# Altium PCB PowerFull.PcbDoc
Units mil, origin at the board's own origin, x right, y up, seen from the top; angles counter-clockwise.
Board outline 8110.03 x 4010.03 mil, 2 copper layers (Top Layer, Bottom Layer); 49 components, 34 nets, 159 pads, 0 vias.
Unrouted connection lines stored in the file: 111.
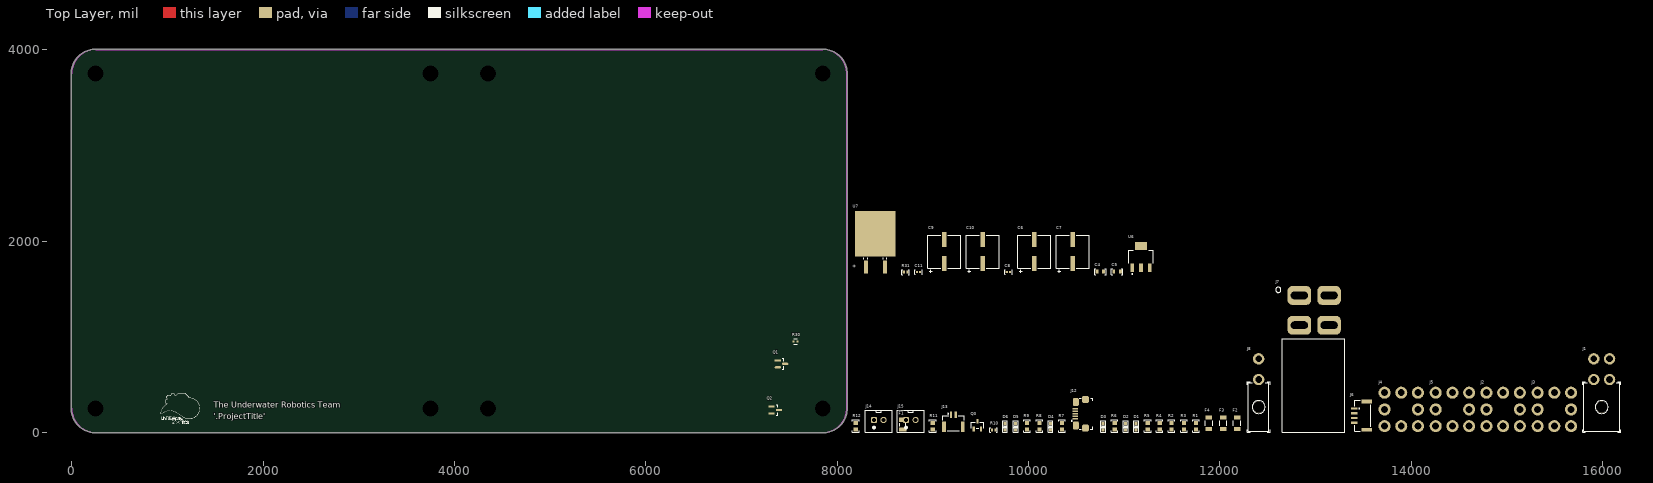
[diagram p0: Top Layer view]
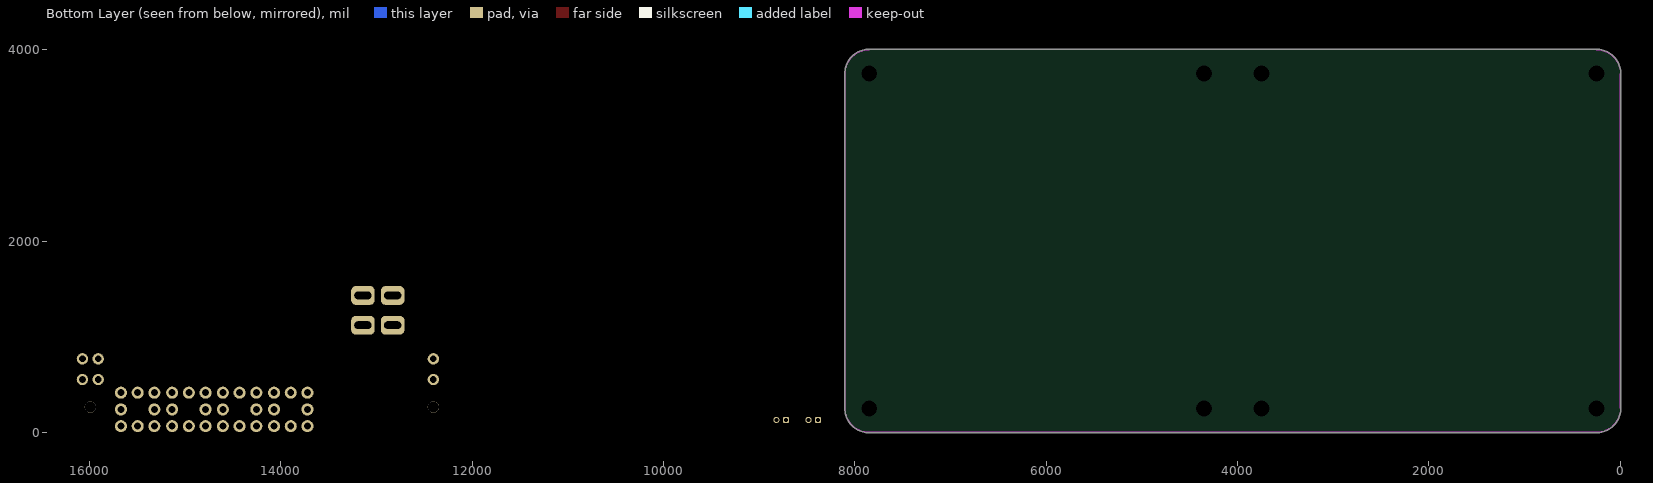
[diagram p1: Bottom Layer view, seen from below]

## Layer stack, top to bottom
Top Solder: solder mask 0.4, Solder Resist, Dk 3.5
Top Layer: signal copper 1.4
Dielectric 1: dielectric 12.6, FR-4, Dk 4.8
Bottom Layer: signal copper 1.4
Bottom Solder: solder mask 0.4, Solder Resist, Dk 3.5

## Board outline
250,-5.01 cw(c250,250) -5.01,250 -5.01,3750 cw(c250,3750) 250,4005.01 7850,4005.01 cw(c7850,3750) 8105.02,3750 8105.02,250 cw(c7850,250) 7850,-5.01

## Design rules (kind name [scope] priority, off if disabled: settings)
Clearance [All] p1: gap=10 ignorepadtopadclearanceinfootprint=FALSE except(0: Arc-Hole Track-Hole SMDPad-Hole THPad-Hole Via-Hole Fill-Hole Poly-Hole Region-Hole Text-Hole)
PolygonConnect [All] p1: connectstyle=Relief reliefconductorwidth=10 reliefentries=4 polygonreliefangle="90 Angle" airgapwidth=10
RoutingVias [All] p1: holewidth=28 width=50 viastyle="Through Hole" minholewidth=28 minwidth=50 maxholewidth=28 maxwidth=50
SolderMaskExpansion [All] p1: expansion=4 istentingtop=FALSE
SupplyNets "Schematic Supply Nets_6" [InNet('3V3')] p1: voltage=0.000
SupplyNets "Schematic Supply Nets_5" [InNet('MOTOR_PWR')] p2: voltage=0.000
SupplyNets "Schematic Supply Nets_4" [InNet('GND')] p3: voltage=0.000
SupplyNets "Schematic Supply Nets_3" [InNet('V+')] p4: voltage=0.000
SupplyNets "Schematic Supply Nets_2" [InNet('12V')] p5: voltage=0.000
SupplyNets "Schematic Supply Nets_1" [InNet('5V')] p6: voltage=0.000
SupplyNets "Schematic Supply Nets" [InNet('Vreg')] p7: voltage=0.000
Width [All] p1: maxlimit=10 minlimit=10 preferedwidth=10
30 further rules are at their usual default settings.

## Classes and differential pairs
component class U_PD_MK2_Power: C4 C5 C6 C7 C8 C9 C10 C11 PS1 PS2 R30 R31 U6 U7
component class Connectors: D1 D2 D3 D4 D5 D6 F1 F2 F3 F4 J1 J2 J3 J4 J5 J6 J7 J8 J9 J10 J11 J12 J13 J14 J15 Q1 Q2 Q3 R1 R2 R3 R4 R5 R6 R7 R8 R9 R10 R11 R12

## Components (designator, comment, footprint, x,y, rotation, side; value= is the part's Value field where it differs from the comment)
C4 "10uF Ceramic 6.3V" CAPACITOR_0603 10750,1680 r0 top
C5 "10uF Ceramic 6.3V" CAPACITOR_0603 10925,1680 r0 top
C6 "100uF electrolytic 35 V" PCAP_8x5.4-ELECT_NCA 10060,1890 r90 top value=100uF
C7 "22uF electrolytic 35 V" PCAP_8x5.4-ELECT_NCA 10460,1890 r90 top value=22uF
C8 "CL05A104KA5NNNC" CAPACITOR_0402 9790,1675 r0 top
C9 "100uF electrolytic 35 V" PCAP_8x5.4-ELECT_NCA 9120,1890 r90 top value=100uF
C10 "22uF electrolytic 35 V" PCAP_8x5.4-ELECT_NCA 9520,1890 r90 top value=22uF
C11 "CL05A104KA5NNNC" CAPACITOR_0402 8850,1675 r0 top
D1 "IN-S63AT5G" LED_0603 11125,60 r90 top
D2 "IN-S63AT5G" LED_0603 11015,60 r90 top
D3 "IN-S63AT5G" LED_0603 10780,60 r90 top
D4 "IN-S63AT5G" LED_0603 10230,60 r90 top
D5 "IN-S63AT5G" LED_0603 9865,60 r90 top
D6 "150060BS75000" LED_0603 9755,60 r90 top
F1 "3413.0330.22" FP-3413_0330_22-MFG 8685,80.71 r90 top value=3.5mΩ
F2 "0685H9150-01" 0501Series_LTF 12180,95 r90 top
F3 "0685H9150-01" 0501Series_LTF 12035,95 r90 top
F4 "0685H9150-01" 0501Series_LTF 11885,95 r90 top
J1 "Mini-Fit Jr R/A" "CONN_MOLEX_MINIFIT JR_4 POS_R/A" 15990,265 r0 top
J2 "Redcube M4 Term 85A" "Redcube M4 Term 85A" 14960,240 r0 top
J3 "Redcube M4 Term 85A" "Redcube M4 Term 85A" 15495,240 r0 top
J4 "Redcube M4 Term 85A" "Redcube M4 Term 85A" 13895,240 r0 top
J5 "Redcube M4 Term 85A" "Redcube M4 Term 85A" 14430,240 r0 top
J6 "JST GH VERT" CONN_JST_BM04B-GHS-TBT(LF)(SN)(N) 13535,175 r90 top
J7 "PP45 R/A" "CONN_ANDERSON_PP45_4 POS_R/A" 12830,1120 r0 top
J8 "Mini-Fit Jr R/A" "CONN_MOLEX_MINIFIT JR_2 POS_R/A" 12405,265 r0 top
J12 "USB_MICRO R/A" CONN_MINIUSB 10595,195 r90 top
J13 "JST GH VERT" CONN_JST_SM02B-GHS-TB(LF)(SN) 9190,185 r0 top
J14 "XH2.54 VERT" CONN_JST_XH254_2POS_VERT 8385,130 r0 top
J15 "XH2.54 VERT" CONN_JST_XH254_2POS_VERT 8720,130 r0 top
Q1 "MMBT3904-7-F" FP-SOT23-IPC_A 7418.45,716.02 r0 top
Q2 "MMBT3904-7-F" FP-SOT23-IPC_A 7353.45,233.98 r0 top
Q3 "PNP 60V 600mA SOT23" SOT-23-3 9465,75 r0 top
R1 "1k Ohm 5% 1/8W" RESISTOR_0603 11750,65 r90 top
R2 "1k Ohm 5% 1/8W" RESISTOR_0603 11495,65 r90 top
R3 "1k Ohm 5% 1/8W" RESISTOR_0603 11625,65 r90 top
R4 "4.7k Ohm 5% 1/10W" RESISTOR_0603 11370,65 r90 top
R5 "3.9k Ohm 5% 1/10W" RESISTOR_0603 11245,65 r90 top
R6 "1k Ohm 5% 1/8W" RESISTOR_0603 10900,65 r90 top
R7 "3.9k Ohm 5% 1/10W" RESISTOR_0603 10350,65 r90 top
R8 "3.9k Ohm 5% 1/10W" RESISTOR_0603 10115,65 r90 top
R9 "3.9k Ohm 5% 1/10W" RESISTOR_0603 9985,65 r90 top
R10 "20k Ohm 1% 1/16W" RESISTOR_0402 9635,25 r0 top
R11 "1k Ohm 5% 1/8W" RESISTOR_0603 9000,65 r90 top
R12 "1k Ohm 5% 1/8W" RESISTOR_0603 8195,65 r90 top
R30 "RT0402BRD071K82L" FP-RT0402-MFG 7565,950 r0 top value=1.82KΩ
R31 "RES 8.56K OHM 1% 1/16W 0402" RESISTOR_0402 8715,1675 r0 top
U6 "LM1117IMPX-3.3/NOPB" SOT-223-4 11175,1835 r90 top
U7 "MBRB2545CT" D2PAK_VIS 8400,2075 r0 top

## Footprints (in the part's own frame and the unit in brackets; to place one, negate y for a bottom-side part, rotate by r counter-clockwise, add the part's x,y. Pads: shape width x height; smd on the part's side, far side on the other; paste and mask are expansions set on the pad)
0501Series_LTF [mil]
  rect 42x68 smd paste+0 mask+0: 1(-59.5,0) 2(59.5,0)
  silkscreen extent -26,-39 26,39, body extent -66,-34 66,34, height 23
CAPACITOR_0402 [mm]
  rect 0.56x0.6 smd: 1(-0.435,0) 2(0.435,0)
  silkscreen extent -1.02,-0.6 1.02,0.6, body extent -0.5,-0.28 0.5,0.27, height 0.51
CAPACITOR_0603 [mil] "CAPACITOR 0603"
  rect 30x40 smd: 1(-35,0) 2(35,0)
  silkscreen extent -60,-30 60,30, body extent -31,-16 32,16, height 31
"CONN_ANDERSON_PP45_4 POS_R/A" [mm] "Anderson Powerpole45 2x2 Red/Black"
  rrect50% 6.25x5 hole 2 slot 4.5 at 0 deg: 1(0,7.9) 2(7.9,7.9) 3(0,0) 4(7.9,0)
  silkscreen extent -6.3,-28.45 12.06,10.12, body extent -4.32,-28.26 11.84,8.45, height 16.17
CONN_JST_BM04B-GHS-TBT(LF)(SN)(N) [mm] "JST GH Pitch 4 Pos Vertical"
  rect 0.6x1.7 smd: 1(1.875,3.35) 2(0.625,3.35) 3(-0.625,3.35) 4(-1.875,3.35)
  rect 1x2.8 smd: S1(-3.725,0) S2(3.725,0)
  silkscreen extent -4.13,-1.1 4.13,3.15, body extent -4.13,-1.12 4.13,3.83, height 4.15
CONN_JST_SM02B-GHS-TB(LF)(SN) [mm] "JST GH Pitch 2 Pos R/A"
  rect 0.6x1.7 smd: 1(0,0) 2(1.25,0)
  rect 1x2.7 smd: S1(-1.85,-3.2) S2(3.1,-3.2)
  silkscreen extent -2.25,-4.3 3.5,0.35, body extent -2.25,-4.28 3.5,0.58, height 4.26
CONN_JST_XH254_2POS_VERT [mm] "JST XH 2.54mm Pitch 2 Pos Vertical"
  rrect50% 1.62x1.62 hole 1.02: 1(0,0)
  round 1.62 hole 1.02: 2(2.54,0)
  silkscreen extent -2.29,-3.3 4.83,2.54, body extent -2.34,-3.35 4.88,2.49, height 7.21
CONN_MINIUSB [mm] "USB2.0 Micro-B Receptacle SMD R/A"
  rrect50% 0.4x1.5 smd: 1(-1.3,2.675) 2(-0.65,2.675) 3(0,2.675) 4(0.65,2.675) 5(1.3,2.675)
  rrect50% 2.1x1.6 smd: 6(-3.1,2.55) 7(3.1,2.55)
  rrect50% 1.9x1.8 smd: 8(3.8,0) 9(-3.8,0)
  silkscreen extent -4.14,-1.96 4.11,3.75, body extent -3.96,-2.67 3.96,2.99, height 2.72
"CONN_MOLEX_MINIFIT JR_2 POS_R/A" [mm] "Molex Minifit Jr 5569 2 Pos R/A"
  round 3 hole 1.8: 1(0,7.3) 2(0,12.8)
  round 3 hole 3 unplated mask+0: ""(0,0)
  silkscreen extent -3.05,-6.73 3.05,6.73, body extent -2.7,-6.6 3.1,13.34, height 11.4
"CONN_MOLEX_MINIFIT JR_4 POS_R/A" [mm] "Molex Minifit Jr 5569 4 Pos R/A"
  round 3 hole 1.8: 1(2.1,7.3) 2(-2.1,7.3) 3(2.1,12.8) 4(-2.1,12.8)
  round 3 hole 3 unplated mask+0: ""(0,0)
  silkscreen extent -5.08,-6.73 5.08,6.73, body extent -4.8,-6.5 5.2,13.44, height 11.4
D2PAK_VIS [mil]
  rect 41x138 smd paste+0 mask+0: 1(-100,-347) 3(100,-347)
  rect 422x474 smd paste+0 mask+0: 2(0,0)
  silkscreen extent -120,-264 120,-250, body extent -210,-402 210,223, height 190
FP-3413_0330_22-MFG [mm]
  rect 1.1x2 smd paste+0 mask+0: 1(-1.3,0) 2(1.3,0)
  silkscreen extent -0.38,-0.8 0.38,0.8, body extent -1.95,-1.1 1.95,1.1, height 0.25
FP-RT0402-MFG [mm]
  rect 0.5x0.6 smd paste+0 mask+0: 1(-0.5,0) 2(0.5,0)
  silkscreen extent -0.5,-0.71 0.5,0.7, body extent -0.85,-0.4 0.85,0.4, height 0.25
FP-SOT23-IPC_A [mm]
  rect 1.659x0.627 smd paste+0 mask+0: 1(-0.977,0.915)
  rrect100% 1.659x0.627 smd paste+0 mask+0: 2(-0.977,-0.915) 3(0.977,0)
  silkscreen extent 0.23,-1.45 0.65,1.45, body extent -2.31,-1.95 2.31,1.95, height 0.25
LED_0603 [mil] "LED 0603"
  rect 32x32 smd: 1(-35,0) 2(35,0)
  silkscreen extent -60,-25 60,25, body extent -31,-16 32,16, height 28
PCAP_8x5.4-ELECT_NCA [mil]
  rect 154x47 smd paste+0 mask+0: 1(-126,0) 2(126,0)
  silkscreen extent -222,-172 172,172, body extent -183,-167 183,160, height 219
"Redcube M4 Term 85A" [mm]
  round 3.2 hole 1.85: 1(-4.435,-4.435) 1(-4.435,0) 1(-4.435,4.435) 1(0,-4.435) 1(0,4.435) 1(4.435,-4.435) 1(4.435,0) 1(4.435,4.435)
  round 3.2 hole 4.1 unplated: 8(0,0)
  body extent -5,-5 5,5, height 3
RESISTOR_0402 [mm] "Resistor 0402"
  rect 0.55x0.75 smd: 1(-0.475,0) 2(0.475,0)
  silkscreen extent -1.02,-0.64 1.02,0.64, body extent -0.5,-0.25 0.5,0.25, height 0.25
RESISTOR_0603 [mil] "Resistor 0603"
  rect 40x45 smd: 1(-33.5,0) 2(33.5,0)
  silkscreen extent -65,-35 65,35, body extent -31,-16 32,16, height 16
SOT-23-3 [mil]
  rect 22x50 smd paste+0 mask+4: 1(-37.5,-41) 2(37.5,-41) 3(0,41)
  silkscreen extent -65,-32 65,32, body extent -60,-52 60,52, height 44
SOT-223-4 [mm]
  rect 2.15x0.95 smd: 1(-2.9,2.3) 2(-2.9,0) 3(-2.9,-2.3)
  rect 2.15x3.25 smd: 4(2.9,0)
  silkscreen extent -4.7,-3.25 1.75,3.25, body extent -3.5,-3.18 3.5,3.32, height 1.68

## Part data
C4 C5: library part CAPACITOR_10uF_0603, "Cap 10uF 6.3V +/-20% / Ceramic 0603", Supplier Part Number 1=1276-1119-1-ND, Tolerance="+/- 20%", Value (uF)="10 uF", Voltage=6.3V, ComponentLink1Description=Digikey, ComponentLink1URL=https://www.digikey.com/en/products/detail/samsung-electro-mechanics/CL10A106MQ8NNNC/3886777, Made By="Flip B", Supplier 1=Digi-Key
C6 C9: library part "CAP ALUM 100UF 20% 35V SMD", "100 µF 35 V Aluminum Electrolytic Capacitors Radial, Can - SMD 1000 Hrs", Manufacturer_Part_Number=UCB1V0R1MCL1GS, Mfr_Name=Nichicon, Supplier Part Number 1=667-EEE-1VA101XP, Copyright="Copyright (C) 2022 Ultra Librarian. All rights reserved.", Made By="Tyson Nguyen", RefDes=RefDes, Supplier 1=Mouser, Type=DEV
C7 C10: library part "CAP ALUM 22UF 20% 35V SMD", "22 µF 35 V Aluminum Electrolytic Capacitors Radial, Can - SMD 1000 Hrs", Supplier Part Number 1=PCE3952DKR-ND, Voltage=35V, Made By="Robert Pafford", Supplier 1=Digi-Key
C8: library part "CAP CER 0.1UF 25V X5R 0402", "0.1 µF ±10% 25V Ceramic Capacitor X5R 0402 (1005 Metric)", Capacitance=0.1uF, Rated Voltage=25V, Supplier Part Number 1=1276-1043-1-ND, Tolerance="+/- 10%", ComponentLink1Description="Data Sheet", ComponentLink1URL=https://mm.digikey.com/Volume0/opasdata/d220001/medias/docus/503/CL05A104KA5NNNC.pdf, Name="Zach Ramsey", Supplier 1=Digikey
C11: library part "CAP CER 0.1UF 25V X5R 0402", "0.1 µF ±10% 25V Ceramic Capacitor X5R 0402 (1005 Metric)", Capacitance=0.1uF, Rated Voltage=25V, Tolerance="+/- 10%", ComponentLink1Description="Data Sheet", ComponentLink1URL=https://mm.digikey.com/Volume0/opasdata/d220001/medias/docus/503/CL05A104KA5NNNC.pdf, Name="Zach Ramsey", Supplier 1=Avnet, Supplier Part Number 1=CL05A104KA5NNNC
D1 D2 D3 D4 D5: library part LED_Green_0603_3V, "LED Green Vf= 3V If = 0.005A / IN-S63AT5G", Color=Green, Forward Current=5mA, Forward Voltage=3V, Package=0603, Supplier Part Number 1=1830-1062-1-ND, ComponentLink1Description=Datasheet, ComponentLink1URL=https://www.we-online.de/katalog/datasheet/150060GS75000.pdf, Made By="Robert Pafford", Supplier 1=Digi-Key
D6: library part LED_Blue_0603, "LED Blue Vf= 3.2V If = 0.020A / 150060BS75000", Color=Blue, Forward Current=20mA, Forward Voltage=3.2V, Package=0603, Supplier Part Number 1=732-4966-1-ND, Made By="Robert Pafford", Supplier 1=Digi-Key
F1: library part CMP-26293-000001-1, "FUSE BOARD MNT 15A 32VAC 63VDC", Ambient Temperature Range High=+90°C, Ambient Temperature Range Low=-55°C, Fuse Current=15A, Fuse Interrupt Dc Current=100A, Fuse Voltage Drop=57mV, Manufacturer="Schurter Inc", Max Fuse Ac Voltage=32V, Max Fuse Dc Voltage=63V, Package=0, Resistance=3.5mΩ, Automotive=No, Category=Fuse, ComponentLink2Description=Datasheet, ComponentLink2URL=https://us.schurter.com/en/datasheet/typ_UST_1206.pdf, Device Class L1="Circuit Protection", Device Class L2=Fuses, Device Class L3=unset, Digikey Description="FUSE BOARD MNT 15A 32VAC 63VDC", Fuse Blow Speed=Slow, Fuse I2T=65A2Sec, Height=0.6mm, Ipc Land Pattern Name=CAPC320160X60, Lead Free=Yes, Manufacturer Part Number=3413.0330.22, Mouser Description="Surface Mount Fuses UST 1206 FUSE 15A F", Octopart=https://octopart.com/3413.0330.22-schurter-8400836, RoHS=TRUE, Voltage Rating=63V
F2 F3 F4: library part "Bel Fuse 15A", "Bel Fuse", Breaking Capacity=150A, Current Rating=15, Package=1206, Voltage Rating=32V, Created By="Nathan Ayer", Manufacturer_Part_Number=0685H9150-01, Mfr_Name="Bel Fuse", Response Time="Fast Blow"
J1: library part "CONN_MOLEX_MINIFIT JR_4POS_R/A", "Molex Minifit Jr. 5569  / 4 Pos R/A Natural", Color=Natural, Current Per Pin=13A, Manufacturer=Molex, Supplier Part Number 1=WM13112-ND, ComponentLink1Description=Datasheet, ComponentLink1URL=https://www.molex.com/pdm_docs/sd/026013115_sd.pdf, Configuration="Right Angle", Created By="Flip B", Number of Positions=4, Pitch=4.2mm, Series="Minifit Jr 5569", Supplier 1=Digi-Key
J2 J3 J4 J5: Current Rating="85 A", Created By="Nahtan Ayer", Screw Size=M4
J6: library part CONN_JST_GH_4POS_VERT, "JST GH Pitch 4 Pos Vertical", Color=Natural, Current Per Pin=1A, Manufacturer=JST, Supplier Part Number 1=455-1580-1-ND, Configuration=Vertical, Created By="Robert P", Number of Positions=4, Pitch=1.25mm, Series=GH, Supplier 1=Digi-Key
J7: library part CONN_ANDERSON_2x2_R/A, "Anderson PP45 / 4 Pos R/A Red/Black", Color=Red/Black, Current Per Pin=45A, Manufacturer=Anderson, Supplier Part Number 1=2243-1337G1-ND, ComponentLink1Description=Datasheet, ComponentLink1URL=https://www.andersonpower.com/content/dam/app/ecommerce/product-pdfs/DS-PP1545.pdf, Configuration="Right Angle", Created By="Flip B", Number of Positions=4, Pitch=7.9mm, Series="PowerPole 45", Supplier 1=Digi-Key, Supplier 2=Digi-Key, Supplier 3=Digi-Key, Supplier 4=Digi-Key, Supplier Part Number 2=2243-1336G1-ND, Supplier Part Number 3=2243-1327-BK-ND, Supplier Part Number 4=A102007-ND
J8: library part "CONN_MOLEX_MINIFIT JR_2POS_R/A", "Molex Minifit Jr. 5569  / 2 Pos R/A Natural", Color=Natural, Current Per Pin=13A, Manufacturer=Molex, Supplier Part Number 1=WM1351-ND, ComponentLink1Description=Datasheet, ComponentLink1URL=https://www.molex.com/pdm_docs/sd/026013115_sd.pdf, Configuration="Right Angle", Created By="Robert P", Number of Positions=2, Pitch=4.2mm, Series="Minifit Jr 5569", Supplier 1=Digi-Key
J12: library part CONN_MICROUSB, "Amphenol Micro USB-B / USB2.0 5 Pin Right Angle SMD", Color=Silver, Current Per Pin=1.8A, Manufacturer=Amphenol, Supplier Part Number 1=609-4613-1-ND, ComponentLink1Description=Datasheet, ComponentLink1URL=https://cdn.amphenol-icc.com/media/wysiwyg/files/documentation/datasheet/inputoutput/io_usb_micro.pdf?__cf_chl_jschl_tk__=05693735e19256298f6ef6ca2bb2e65c376a4f56-1625503833-0-Abitsb0-ufjOXJYs_S3J3r2iTn-nObalbmXUksF1VvO_h_WEmRdMlUD1I8-hmWSEVWzY1pirKnrPZWfgY3851qyBZe5ZvnNQePLGIzUgdEIQBVUyW36RsbYpDLEWxJ4horD-5gChFgobLYqwmG5aHl0E8lIn_twwPPrOxilK2gP0q9t_CNOs_u5fMqXvXUrlsOv8tIE2NRlu6NVP8qtkL2GjhlkeTUbDMF8WvvpPDTFOgvZ4Y16Ej8F8AhWos88mo5B1HssXozw0XrkJQIqERITUu6rqloz9kf4ZzhBHtDAt-IkiAFY_Ds9SW8FYKKTtINJVpHZQ6Gyu1FFM4Dc9MO0maE8_mmNcwlxqyRoRk_MPWW8VyByXWM5RSp52jteRKw7FeI9WIYvCbPAOy0Eyib-aseIQsnGbglBcUY6_2xp8GYaJM38H3dNvBPsSOfJBPndKedwKHllxjkucXn6xsN0sDXkpGN-cu8_2bDTJ0g-uUucKSCooYX-ApSDNGpkA_p9zv1SOAD8c0zaZVmtiBsN75QpVz2rzq9_BFxOywPvR, Configuration="Right Angle", Created By="Flip B", Number of Positions=5, Pitch=0.65mm, Series=10118192, Supplier 1=Digi-Key
J13: library part CONN_JST_GH_2POS_VERT, "JST GH Pitch 2 Pos Vertical", Color=Natural, Current Per Pin=1A, Manufacturer=JST, Supplier Part Number 1=455-1564-1-ND, Configuration=Vertical, Created By="Robert P", Number of Positions=4, Pitch=1.25mm, Series=GH, Supplier 1=Digi-Key
J14 J15: library part CONN_JST_XH254_2POS_VERT, "JST XH 2.54mm Pitch 2 Pos Vertical", Color=White, Current Per Pin=4A, Manufacturer=JST, ComponentLink1Description="Purchase Link", ComponentLink1URL=https://www.amazon.com/460PCS-XH2-54-Connector-Terminal-Connectors/dp/B09DBGVX5C, Configuration=Vertical, Created By="Robert P", NOTE="Do not use JST 2.5mm parts with this footprint. JST does not make 2.54mm pitch pins, rather only clones make this connector!", Number of Positions=2, Pitch=2.54mm, Series="XH 2.54"
Q1 Q2: library part CMP-2000-04931-2, "TRANS NPN 40V 0.2A SMD SOT23-3", Case/Package=SOT-23, Collector Base Voltage (VCBO)=60V, Collector Emitter Breakdown Voltage=40V, Collector Emitter Saturation Voltage=300mV, Continuous Collector Current=200mA, Emitter Base Voltage (VEBO)=6V, Frequency=300MHz, Max Operating Temperature=150°C, Max Power Dissipation=300mW, Min Operating Temperature=-55°C, Package Quantity=3000, Power Dissipation=350mW, Collector Emitter Voltage (VCEO)=40V, Contact Plating=Tin, Element Configuration=Single, Gain Bandwidth Product=300MHz, Height=1mm, hFE Min=100, Lead Free="Lead Free", Length=3.05mm, Max Breakdown Voltage=40V, Max Collector Current=200mA, Max Frequency=300MHz, Mount="Surface Mount", Number of Elements=1, Number of Pins=3, Packaging="Tape and Reel", Polarity=NPN, Radiation Hardening=No, REACH SVHC="No SVHC", Transition Frequency=300MHz, Voltage Rating (DC)=40V, Weight=0.000282oz, Width=1.4mm
Q3: library part MMBT2907A-7-F, "PNP 60 V 600mA Surface Mount SOT-23", Amp Rating=600mA, Package="TO-236-3, SC-59, SOT-23-3", Power Dissipation="1.56W (Tc)", Supplier Part Number 1=MMBT2907A-FDICT-ND, BJT Type=PNP, ComponentLink1Description=Datasheet, ComponentLink1URL=https://media.digikey.com/pdf/Data%20Sheets/Diodes%20PDFs/MMBT2907A_Rev2016.pdf, Created By="Robert Pafford", Manufacturer_Part_Number=MMBT2907A-7-F, Rds (on)="50mOhm @ 3A, 4.5V", Supplier 1=Digi-Key, Vdss="20 V", Vendor=Digikey, Vgs (Max)=±10V, Vgs (th)="800mV @ 250µA"
R1 R2 R3 R6 R11 R12: library part RESISTOR_1K_0603, "RES 1k OHM 5% 1/8W 0603", Digikey Part Numer=CR0603-JW-104ELFTR-ND, Supplier Part Number 1=2019-RK73B1JTTD102JCT-ND, Tolerance="+/- 5%", Value  (Ohms)=1K, ComponentLink1Description=Datasheet, ComponentLink1URL=https://www.bourns.com/docs/product-datasheets/CRxxxxx.pdf, Made By="Robert Pafford", Supplier=Digikey, Supplier 1=Digi-Key, Wattage=1/8W
R4: library part RESISTOR_4.7K_0603, "RES 4.7k OHM 5% 1/10W 0603", Digikey Part Numer=CR0603-JW-104ELFTR-ND, Supplier Part Number 1=RMCF0603JT4K70CT-ND, Tolerance="+/- 5%", Value  (Ohms)=4.7K, Made By="Robert Pafford", Supplier=Digikey, Supplier 1=Digi-Key, Wattage=1/10W
R5 R7 R8 R9: library part RESISTOR_3.9K_0603, "RES 3.9k OHM 1% 1/10W 0603", Supplier Part Number 1=P3.90KHCT-ND, Tolerance="+/- 1%", Value  (Ohms)=3.9K, Made By="Robert Pafford", Supplier 1=Digi-Key, Wattage=1/10W
R10: library part RESISTOR_20K_0402, "RES 20k OHM 1% 1/16W 0402", Supplier Part Number 1=YAG3454CT-ND, Tolerance="+/- 1%", Value  (Ohms)=20K, Made By="Robert Pafford", Supplier 1=Digikey, Wattage=1/16W
R30: library part CMP-03412-030148-1, "RES SMD 1.82K OHM 0.1% 1/16W", Manufacturer=Yageo, Package=RT0402, Power Rating=0.063W, Resistance=1.82KΩ, Temperature="-55°C to +155°C", Temperature Coefficient="25 ppm/°C", Temperature Range High=+155°C, Temperature Range Low=-55°C, Tolerance=0.001, Voltage Rating=50V, Automotive=No, Category=Res, ComponentLink2Description=Datasheet, ComponentLink2URL=http://www.yageo.com/documents/recent/PYu-RT_1-to-0.01_RoHS_L_9.pdf, Composition="Thin Film", Device Class L1="Passive Components", Device Class L2=Resistors, Device Class L3="Chip SMD Resistors", Digikey Description="RES SMD 1.82K OHM 0.1% 1/16W", Footprint Url=http://www.yageo.com/exep/pages/download/literatures/PYu-R_Mount_10.pdf, Height=0.35mm, Ipc Land Pattern Name=RESC10050X30, Lead Free=Yes, Manufacturer Part Number=RT0402BRD071K82L, Mouser Description="Thin Film Resistors 1/16W 1.82K ohm .1% 25ppm", Octopart=https://octopart.com/rt0402brd071k82l-yageo-1433757, RoHS=TRUE, Series=RT
R31: library part RESISTOR_8.56K_1%_0402, "8.56 kOhms ±1% 0.063W, 1/16W Chip Resistor 0402 (1005 Metric) Automotive AEC-Q200, Moisture Resistant Metal Film", Supplier Part Number 1=2019-RN73H1ETTP8561F50CT-ND, Tolerance="+/- 1%", Value (Ohms)=8.56K, Made By="John Ulm", Supplier 1=Digi-Key, Wattage=1/16W
U6: "800-mA 15-V linear voltage regulator 4-SOT-223 -40 to 125", Package="SOT-223-4 Texas Instruments", Arrow_Electronics-Purchase-URL=https://snapeda.com/shop?store=Arrow+Electronics&id=410186, Availability=Good, DigiKey-Purchase-URL=https://snapeda.com/shop?store=DigiKey&id=410186, MF="Texas Instruments", Mouser-Purchase-URL=https://snapeda.com/shop?store=Mouser&id=410186, MP=LM1117IMPX-3.3/NOPB, Price=None, SnapEDA_Link=https://www.snapeda.com/parts/LM1117IMPX-3.3/NOPB/Texas%20Instruments/view-part/410186/?ref=snap, Texas_Instruments-Purchase-URL=https://snapeda.com/shop?store=Texas+Instruments&id=410186
U7: "Diode Array 1 Pair Common Cathode 45 V Surface Mount TO-263-3, D²Pak (2 Leads + Tab), TO-263AB", Mfr_Name=Vishay, ComponentLink1Description="Supplier Link", ComponentLink1URL=https://www.digikey.com/en/products/detail/smc-diode-solutions/MBRB2545CT/6022901, Copyright="Copyright (C) 2023 Ultra Librarian. All rights reserved.", Manufacturer_Part_Number=MBRB2545CT, RefDes=RefDes, Type=DEV

## Free pads (board coordinates)
  round 60 hole 165: 1(250,250) 1(250,3750) 1(3750,250) 1(3750,3750) 1(4350,250) 1(4350,3750) 1(7850,250) 1(7850,3750)

## Nets (pads, with @x,y where several pads share a name; then routed paths per layer and width w, separated by ;. In a path a pad name is that pad's centre, name@x,y a point inside that pad or via, vN(x,y) a via of type N, cw(c..) or ccw(c..) an arc to the next point about the centre after c; other vN are vias at no path point)
3V3: C5.1 Q3.2 R1.1 R2.1 R4.2 R10.1 U6.2 U6.4
5V: C4.1 C10.1 C11.1 F4.1 J6.1 R3.1 R6.1 U6.3
12V: C7.1 C8.1 F1.2 F3.1 J14.1 J15.1 R9.1
"12V Toggle": 
AUX_SWITCH: J1.3
CANH: 
CANL: 
GND: C4.2 C5.2 C6.2 C7.2 C8.2 C9.2 C10.2 C11.2 D1.2 D2.2 D3.2 D4.2 D5.2 D6.2 J1.1 J1.2 J3.1 J5.1 J6.4 J6.S1 J6.S2 J7.3 J7.4 J8.1 J12.5 J12.6 J12.7 J12.8 J12.9 J13.2 J13.S1 J13.S2 J14.2 J15.2 R12.2 R30.1 R31.2 U6.1
KILL_SWITCH: J1.4
Leak_Detect: Q3.3 R12.1
MOTOR_PWR: J2.1 J4.1 R8.1
NetD1_1: D1.1 R5.2
NetD2_1: D2.1 R4.1
NetD3_1: D3.1 R6.2
NetD4_1: D4.1 R7.2
NetD5_1: D5.1 R9.2
NetD6_1: D6.1 R8.2
NetF1_1: F1.1 J8.2
NetF2_2: F2.2
NetF3_2: F3.2
NetF4_2: F4.2
NetJ13_1: J13.1 R11.2
NetPS1_6: R30.2
NetPS2_6: R31.1
NetQ1_1: Q1.1 Q2.1 R1.2
NetQ3_1: Q3.1 R10.2 R11.1
SCL_0: J6.2
SDA_0: J6.3
SERVO_3V3: Q1.2 Q2.3 R2.2
SERVO_5V: Q1.3 Q2.2 R3.2
USB_N: J12.2
USB_P: J12.3
V+: J7.1 J7.2 R7.1 U7.1 U7.3
Vreg: C6.1 C9.1 F2.1 R5.1 U7.2
pads on no net: J1. J2.8 J3.8 J4.8 J5.8 J8. J12.1 J12.4

## Keep-outs
Keep-Out Layer:
  lines w10: 3750,0 250,0 ; 250,0 cw(c250,250) 0,250 0,3750 cw(c250,3750) 250,4000 7850,4000 cw(c7850,3750) 8100,3750 8100,250 cw(c7850,250) 7850,0 250,0

## Silkscreen, mask and mechanical layers (free items; w line width, h text height)
Top Overlay:
  drawing of 19 lines, arcs and shapes, not listed
  text "The Underwater Robotics Team" at 1485,260 h60
  text "'.ProjectTitle'" at 1485,135 h60

## Text inside footprints (layer, text, board x,y; h text height)
U7: Top Overlay "*" at 8162.5,1703 h50; Top 3D Body "*" at 8287.5,1837 h50